# Altium PCB LEDControl1.PcbDoc (part 1 of 6)
Units mm, origin at the board's own origin, x right, y up, seen from the top; angles counter-clockwise.
Board outline 380 x 185 mm, 2 copper layers (Top Layer, Bottom Layer), stack 0.533 mm thick; 673 components, 368 nets, 1993 pads, 2553 vias.
Unrouted connection lines stored in the file: 1155.
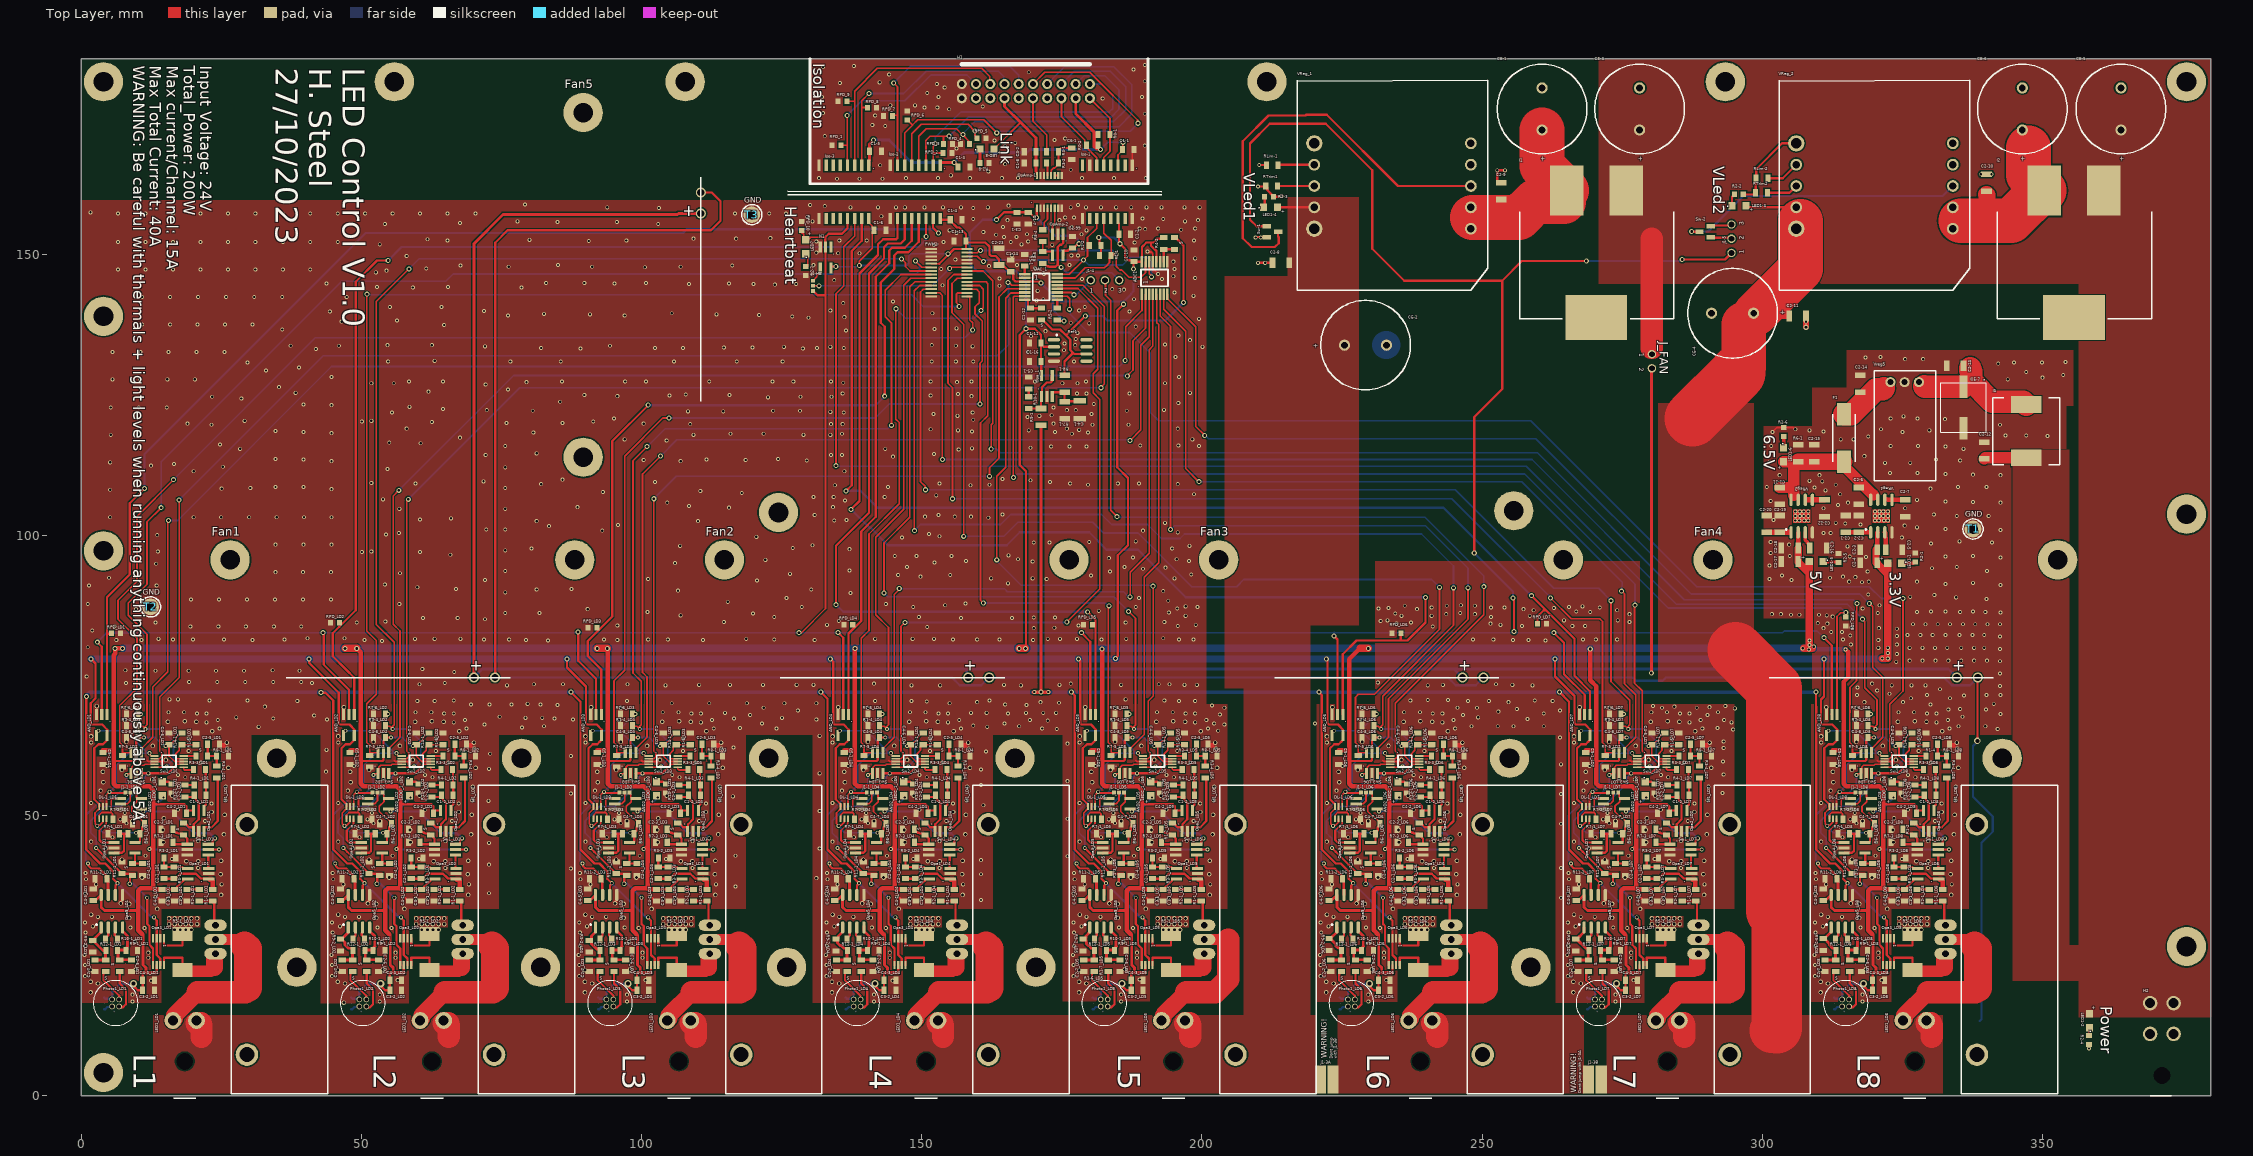
[diagram p0: Top Layer view]
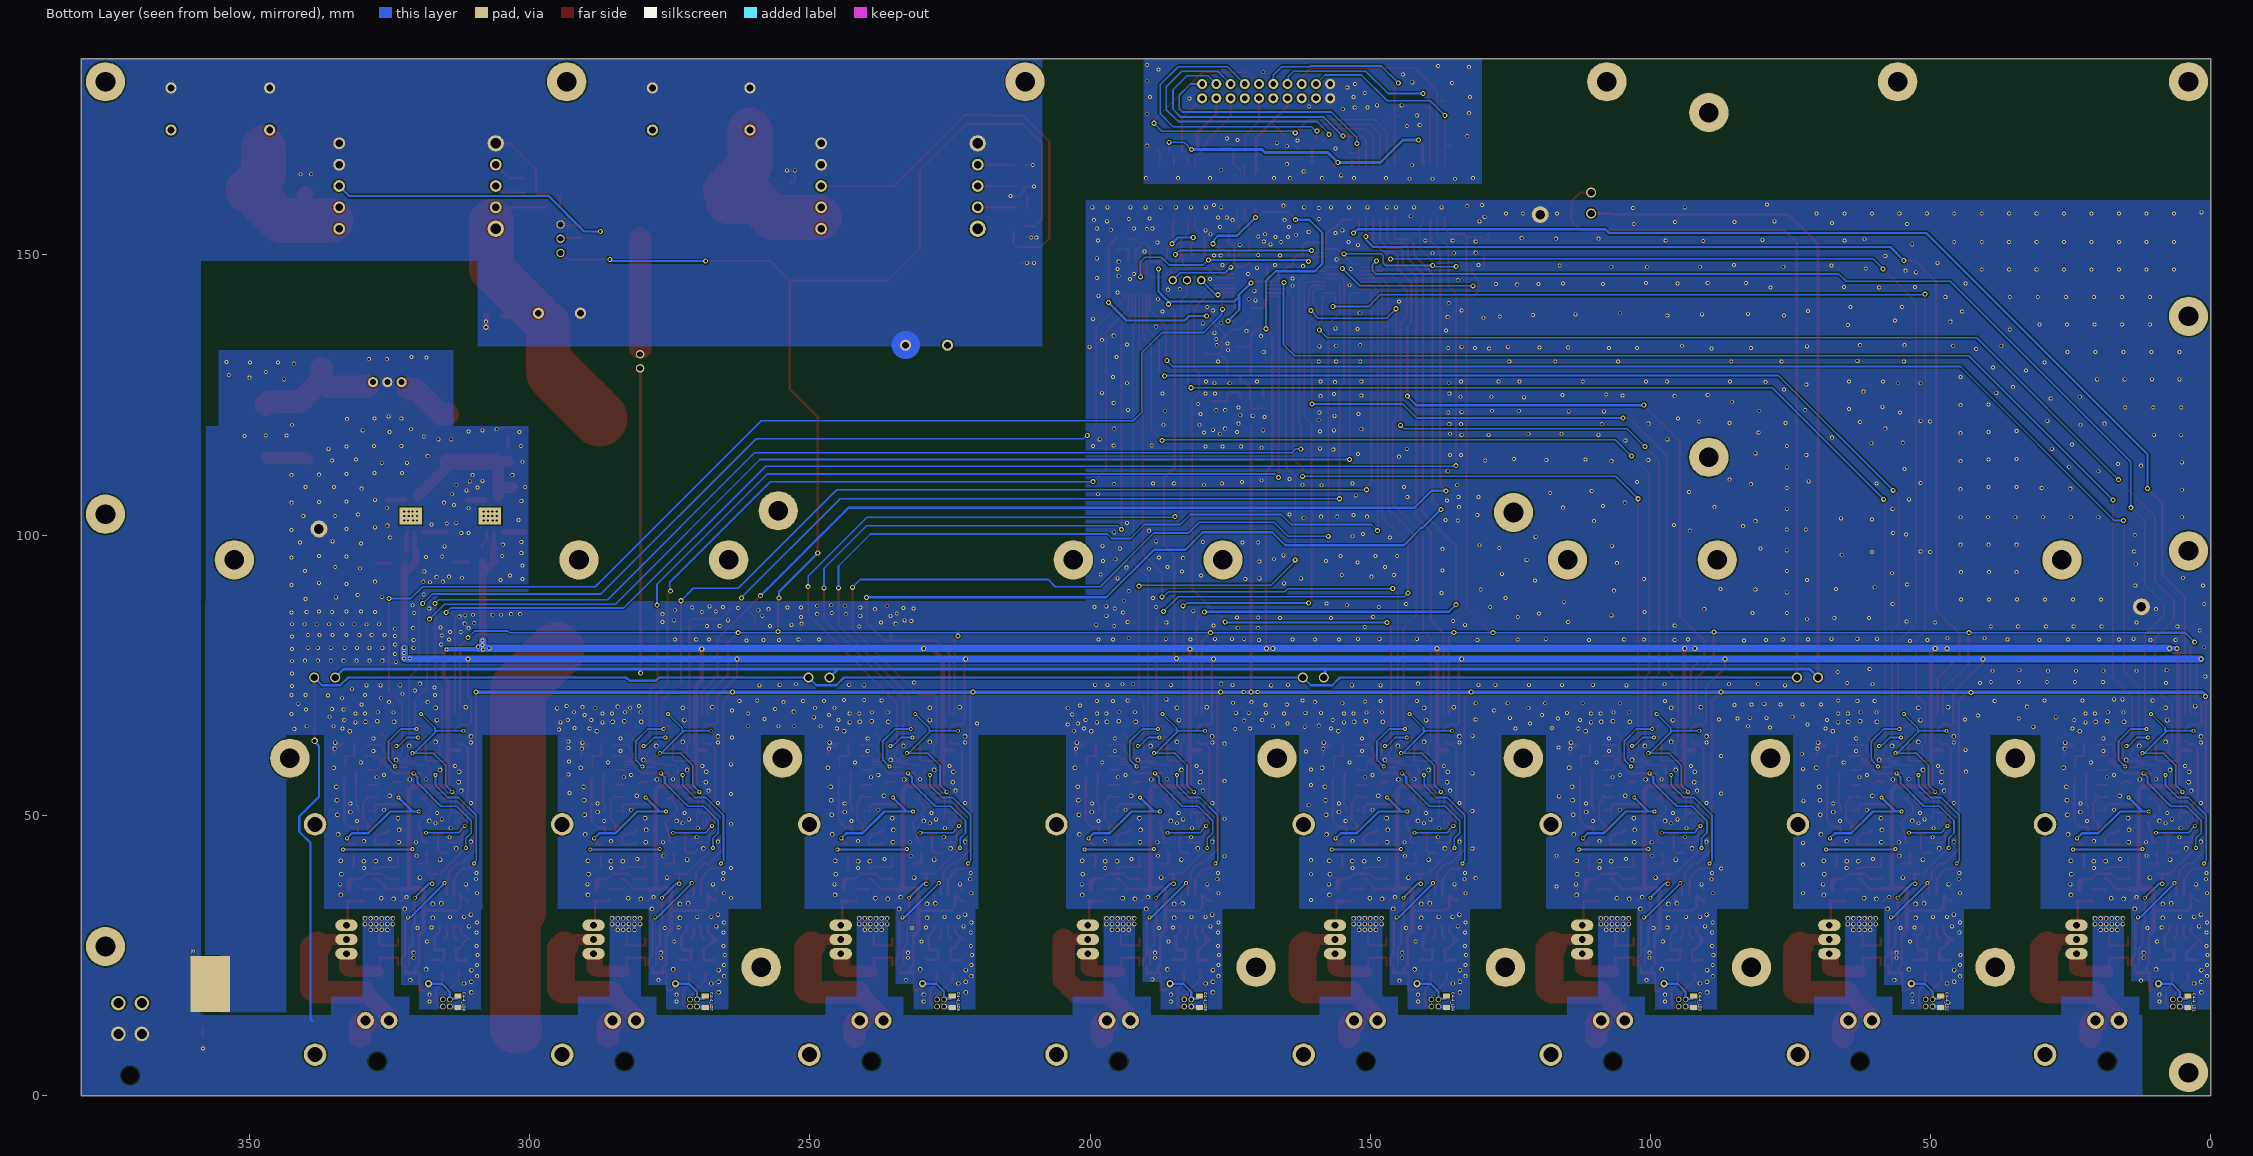
[diagram p1: Bottom Layer view, seen from below]

## Layer stack, top to bottom
Top Solder: solder mask 0.0102, Solder Resist, Dk 3.5
Top Layer: signal copper 0.0356
Dielectric 2: prepreg 0.0711, PP-006, Dk 4.1
Dielectric 1: dielectric 0.32, FR-4, Dk 4.8
Dielectric 3: prepreg 0.0711, PP-006, Dk 4.1
Bottom Layer: signal copper 0.0356
Bottom Solder: solder mask 0.0102, Solder Resist, Dk 3.5

## Board outline
0,0 0,185 380,185 380,0

## Design rules (kind name [scope] priority, off if disabled: settings)
Clearance [All] p1: gap=0.25 ignorepadtopadclearanceinfootprint=TRUE except(0: Arc-Text Track-Text SMDPad-Text THPad-Text Via-Text Fill-Text Poly-Text Region-Text Text-Text Text-Hole; 0.2: Arc-Arc Arc-Track Arc-SMDPad Track-Track Track-SMDPad SMDPad-SMDPad THPad-THPad)
HoleSize [All] p1: absolutevalues=TRUE maxlimit=99 minlimit=0.025 maxpercent=80.000 minpercent=20.000
MinimumSolderMaskSliver [All] p1: minsoldermaskwidth=0
PlaneConnect [All] p1: planeconnectstyle=Direct reliefexpansion=0.508 reliefentries=4 reliefconductorwidth=0.254 reliefairgap=0.254
PolygonConnect [All] p1: connectstyle=Direct reliefconductorwidth=0.5 reliefentries=4 polygonreliefangle="90 Angle" airgapwidth=0.254
RoomDefinition SyncBoard1 [InComponentClass('SyncBoard1')] p1: confinementstyle=ConfineIn formatcopy=TRUE lockcomponents=FALSE outline 264.6,0 308.7,0 308.7,69.8 264.6,69.8
RoutingVias [All] p1: holewidth=0.45 width=0.8 viastyle="Through Hole" minholewidth=0.3 minwidth=0.5 maxholewidth=2 maxwidth=10
SolderMaskExpansion [All] p1: expansion=0.102 istentingtop=FALSE
Width [All] p1: maxlimit=50 minlimit=0.254 preferedwidth=0.254 minimp=50.000000 maximp=50.000000 favimp=50.000000
27 further rules are at their usual default settings.

## Classes and differential pairs
channel class LEDDrive1: LD1 LD2 LD3 LD4 LD5 LD6 LD7 LD8
net class VLed[1..8]: VLed1 VLed6 VLed7
net class EN[1..8]: EN1 EN2 EN3 EN4 EN5 EN6 EN7 EN8
net class DB[1..8]: DB1 DB2 DB3 DB4 DB5 DB6 DB7 DB8
net class DAC[1..8]: DAC1 DAC2 DAC3 DAC4 DAC5 DAC6 DAC7 DAC8
net class DA[1..8]: DA1 DA2 DA3 DA4 DA5 DA6 DA7 DA8
net class ADC[1..8]: ADC1 ADC2 ADC3 ADC4 ADC5 ADC6 ADC7 ADC8
component class LEDControl1: ADC1 C1-1 C1-2 C1-3 C1-4 C1-5 C1-6 C1-7 C1-8 C1-10 C1-11 C1-12 C1-13 C1-14 C1-16 C1-99 C2-1 C2-2 C2-3 C2-4 C2-5 C2-6 C2-7 C2-8 C2-9 C2-10 C2-11 C2-12 C2-13 C2-14 C2-15 C2-16 C2-17 C2-18 C2-19 C2-20 C2-21 C2-22 C2-23 C3-1 C3-2 C4-1 C5-1 C6-1 CE-1 CE-2 CE-3 CE-4 CE-5 CE-6 CE-7 DAC_1 F1 Fan1 Fan2 Fan3 Fan4 Fan5 H1 H2 I1 I2 I3 Iso-1 Iso-2 Iso-3 J1-3A J1-3B J1-4 J1-5 J1-HB J_FAN JG LED1-1 LED1-2 LED1-3 LED1-4 LED1-5 LED1-6 LED7 LED-8 N1 Opa_1 OpAmp-1 OpAmp-2 PWM1 R0-1 R0-2 R1-1 R1-2 R1-3_LD8 R2-1 R2-2 R2-3 R2-4 R2-5 R2-6 R2-7 R2-8 R3-1 R3-2 R3-3 R3-4_LD5 R4-2 R5-1 R5-2 R6-1 R7-1 R8-1 R9-1 R10-1 Ref1 RLim-1 RLim-2 RPD_1 RPD_2 RPD_3 RPD_4 RPD_5 RPD_6 RPD_7 RPD_8 RPD_9 RPD_10 RTrim1 RTrim2 Sw-1 Sw-2 T1 T2 T3 VReg3 VReg4 Vreg5 VReg_1 VReg_2
component class LD8: AND2_LD8 AND_LD8 C1-1_LD8 C1-2_LD8 C2-1_LD8 C2-2_LD8 C2-3_LD8 C2-4_LD8 C2-5_LD8 C2-6_LD8 C2-7_LD8 C3-1_LD8 C3-2_LD8 C4-1_LD8 C4-2_LD8 C4-3_LD8 C4-4_LD8 C4-5_LD8 C4-6_LD8 C4-7_LD8 C4-8_LD8 C5-1_LD8 DL-1_LD8 J1-1_LD8 LED1_LD8 LEDC_1_LD8 M1_LD8 Opa1_LD8 Opa2_LD8 Opa3_LD8 Opa4_LD8 Opa5_LD8 Photo1_LD8 R1-1_LD8 R1-3_LD8 R1-5_LD8 R2-1_LD8 R3-1_LD8 R3-2_LD8 R3-3_LD8 R3-4_LD8 R4-1_LD8 R5-1_LD8 R6-1_LD8 R7-1_LD8 R7-2_LD8 R7-3_LD8 R7-4_LD8 R7-5_LD8 R7-6_LD8 R8-1_LD8 R9-1_LD8 R9-2_LD8 R10-1_LD8 R11-1_LD8 R11-2_LD8 R12-1_LD8 R13-1_LD8 R14-1_LD8 RPD_LD8 Sw1_LD8 Sw2_LD8 Sw3_LD8
component class LD7: AND2_LD7 AND_LD7 C1-1_LD7 C1-2_LD7 C2-1_LD7 C2-2_LD7 C2-3_LD7 C2-4_LD7 C2-5_LD7 C2-6_LD7 C2-7_LD7 C3-1_LD7 C3-2_LD7 C4-1_LD7 C4-2_LD7 C4-3_LD7 C4-4_LD7 C4-5_LD7 C4-6_LD7 C4-7_LD7 C4-8_LD7 C5-1_LD7 DL-1_LD7 J1-1_LD7 LED1_LD7 LEDC_1_LD7 M1_LD7 Opa1_LD7 Opa2_LD7 Opa3_LD7 Opa4_LD7 Opa5_LD7 Photo1_LD7 R1-1_LD7 R1-3_LD8 R1-5_LD7 R2-1_LD7 R3-1_LD7 R3-2_LD7 R3-3_LD7 R3-4_LD7 R4-1_LD7 R5-1_LD7 R6-1_LD7 R7-1_LD7 R7-2_LD7 R7-3_LD7 R7-4_LD7 R7-5_LD7 R7-6_LD7 R8-1_LD7 R9-1_LD7 R9-2_LD7 R10-1_LD7 R11-1_LD7 R11-2_LD7 R12-1_LD7 R13-1_LD7 R14-1_LD7 RPD_LD7 Sw1_LD7 Sw2_LD7 Sw3_LD7
component class LD6: AND2_LD6 AND_LD6 C1-1_LD6 C1-2_LD6 C2-1_LD6 C2-2_LD6 C2-3_LD6 C2-4_LD6 C2-5_LD6 C2-6_LD6 C2-7_LD6 C3-1_LD6 C3-2_LD6 C4-1_LD6 C4-2_LD6 C4-3_LD6 C4-4_LD6 C4-5_LD6 C4-6_LD6 C4-7_LD6 C4-8_LD6 C5-1_LD6 DL-1_LD6 J1-1_LD6 LED1_LD6 LEDC_1_LD6 M1_LD6 Opa1_LD6 Opa2_LD6 Opa3_LD6 Opa4_LD6 Opa5_LD6 Photo1_LD6 R1-1_LD6 R1-3_LD8 R1-5_LD6 R2-1_LD6 R3-1_LD6 R3-2_LD6 R3-3_LD6 R3-4_LD6 R4-1_LD6 R5-1_LD6 R6-1_LD6 R7-1_LD6 R7-2_LD6 R7-3_LD6 R7-4_LD6 R7-5_LD6 R7-6_LD6 R8-1_LD6 R9-1_LD6 R9-2_LD6 R10-1_LD6 R11-1_LD6 R11-2_LD6 R12-1_LD6 R13-1_LD6 R14-1_LD6 RPD_LD6 Sw1_LD6 Sw2_LD6 Sw3_LD6
component class LD5: AND2_LD5 AND_LD5 C1-1_LD5 C1-2_LD5 C2-1_LD5 C2-2_LD5 C2-3_LD5 C2-4_LD5 C2-5_LD5 C2-6_LD5 C2-7_LD5 C3-1_LD5 C3-2_LD5 C4-1_LD5 C4-2_LD5 C4-3_LD5 C4-4_LD5 C4-5_LD5 C4-6_LD5 C4-7_LD5 C4-8_LD5 C5-1_LD5 DL-1_LD5 J1-1_LD5 LED1_LD5 LEDC_1_LD5 M1_LD5 Opa1_LD5 Opa2_LD5 Opa3_LD5 Opa4_LD5 Opa5_LD5 Photo1_LD5 R1-1_LD5 R1-3_LD8 R1-5_LD5 R2-1_LD5 R3-1_LD5 R3-2_LD5 R3-3_LD5 R3-4_LD5 R4-1_LD5 R5-1_LD5 R6-1_LD5 R7-1_LD5 R7-2_LD5 R7-3_LD5 R7-4_LD5 R7-5_LD5 R7-6_LD5 R8-1_LD5 R9-1_LD5 R9-2_LD5 R10-1_LD5 R11-1_LD5 R11-2_LD5 R12-1_LD5 R13-1_LD5 R14-1_LD5 RPD_LD5 Sw1_LD5 Sw2_LD5 Sw3_LD5
component class LD4: AND2_LD4 AND_LD4 C1-1_LD4 C1-2_LD4 C2-1_LD4 C2-2_LD4 C2-3_LD4 C2-4_LD4 C2-5_LD4 C2-6_LD4 C2-7_LD4 C3-1_LD4 C3-2_LD4 C4-1_LD4 C4-2_LD4 C4-3_LD4 C4-4_LD4 C4-5_LD4 C4-6_LD4 C4-7_LD4 C4-8_LD4 C5-1_LD4 DL-1_LD4 J1-1_LD4 LED1_LD4 LEDC_1_LD4 M1_LD4 Opa1_LD4 Opa2_LD4 Opa3_LD4 Opa4_LD4 Opa5_LD4 Photo1_LD4 R1-1_LD4 R1-3_LD8 R1-5_LD4 R2-1_LD4 R3-1_LD4 R3-2_LD4 R3-3_LD4 R3-4_LD4 R4-1_LD4 R5-1_LD4 R6-1_LD4 R7-1_LD4 R7-2_LD4 R7-3_LD4 R7-4_LD4 R7-5_LD4 R7-6_LD4 R8-1_LD4 R9-1_LD4 R9-2_LD4 R10-1_LD4 R11-1_LD4 R11-2_LD4 R12-1_LD4 R13-1_LD4 R14-1_LD4 RPD_LD4 Sw1_LD4 Sw2_LD4 Sw3_LD4
component class LD3: AND2_LD3 AND_LD3 C1-1_LD3 C1-2_LD3 C2-1_LD3 C2-2_LD3 C2-3_LD3 C2-4_LD3 C2-5_LD3 C2-6_LD3 C2-7_LD3 C3-1_LD3 C3-2_LD3 C4-1_LD3 C4-2_LD3 C4-3_LD3 C4-4_LD3 C4-5_LD3 C4-6_LD3 C4-7_LD3 C4-8_LD3 C5-1_LD3 DL-1_LD3 J1-1_LD3 LED1_LD3 LEDC_1_LD3 M1_LD3 Opa1_LD3 Opa2_LD3 Opa3_LD3 Opa4_LD3 Opa5_LD3 Photo1_LD3 R1-1_LD3 R1-3_LD8 R1-5_LD3 R2-1_LD3 R3-1_LD3 R3-2_LD3 R3-3_LD3 R3-4_LD3 R4-1_LD3 R5-1_LD3 R6-1_LD3 R7-1_LD3 R7-2_LD3 R7-3_LD3 R7-4_LD3 R7-5_LD3 R7-6_LD3 R8-1_LD3 R9-1_LD3 R9-2_LD3 R10-1_LD3 R11-1_LD3 R11-2_LD3 R12-1_LD3 R13-1_LD3 R14-1_LD3 RPD_LD3 Sw1_LD3 Sw2_LD3 Sw3_LD3
component class LD2: AND2_LD2 AND_LD2 C1-1_LD2 C1-2_LD2 C2-1_LD2 C2-2_LD2 C2-3_LD2 C2-4_LD2 C2-5_LD2 C2-6_LD2 C2-7_LD2 C3-1_LD2 C3-2_LD2 C4-1_LD2 C4-2_LD2 C4-3_LD2 C4-4_LD2 C4-5_LD2 C4-6_LD2 C4-7_LD2 C4-8_LD2 C5-1_LD2 DL-1_LD2 J1-1_LD2 LED1_LD2 LEDC_1_LD2 M1_LD2 Opa1_LD2 Opa2_LD2 Opa3_LD2 Opa4_LD2 Opa5_LD2 Photo1_LD2 R1-1_LD2 R1-3_LD8 R1-5_LD2 R2-1_LD2 R3-1_LD2 R3-2_LD2 R3-3_LD2 R3-4_LD2 R4-1_LD2 R5-1_LD2 R6-1_LD2 R7-1_LD2 R7-2_LD2 R7-3_LD2 R7-4_LD2 R7-5_LD2 R7-6_LD2 R8-1_LD2 R9-1_LD2 R9-2_LD2 R10-1_LD2 R11-1_LD2 R11-2_LD2 R12-1_LD2 R13-1_LD2 R14-1_LD2 RPD_LD2 Sw1_LD2 Sw2_LD2 Sw3_LD2
component class LD1: AND2_LD1 AND_LD1 C1-1_LD1 C1-2_LD1 C2-1_LD1 C2-2_LD1 C2-3_LD1 C2-4_LD1 C2-5_LD1 C2-6_LD1 C2-7_LD1 C3-1_LD1 C3-2_LD1 C4-1_LD1 C4-2_LD1 C4-3_LD1 C4-4_LD1 C4-5_LD1 C4-6_LD1 C4-7_LD1 C4-8_LD1 C5-1_LD1 DL-1_LD1 J1-1_LD1 LED1_LD1 LEDC_1_LD1 M1_LD1 Opa1_LD1 Opa2_LD1 Opa3_LD1 Opa4_LD1 Opa5_LD1 Photo1_LD1 R1-1_LD1 R1-3_LD8 R1-5_LD1 R2-1_LD1 R3-1_LD1 R3-2_LD1 R3-3_LD1 R3-4_LD1 R4-1_LD1 R5-1_LD1 R6-1_LD1 R7-1_LD1 R7-2_LD1 R7-3_LD1 R7-4_LD1 R7-5_LD1 R7-6_LD1 R8-1_LD1 R9-1_LD1 R9-2_LD1 R10-1_LD1 R11-1_LD1 R11-2_LD1 R12-1_LD1 R13-1_LD1 R14-1_LD1 RPD_LD1 Sw1_LD1 Sw2_LD1 Sw3_LD1

## Components (designator, comment, footprint, x,y, rotation, side; value= is the part's Value field where it differs from the comment)
ADC1 "ADS7828" 16-TSSOP 189.3,143 r90 top
AND2_LD1 "AND_Gate" SOT23-5 7.05,53 r0 top (schematic designator AND2)
AND2_LD2 "AND_Gate" SOT23-5 51.15,53 r0 top (schematic designator AND2)
AND2_LD3 "AND_Gate" SOT23-5 95.25,53 r0 top (schematic designator AND2)
AND2_LD4 "AND_Gate" SOT23-5 139.35,53 r0 top (schematic designator AND2)
AND2_LD5 "AND_Gate" SOT23-5 183.45,53 r0 top (schematic designator AND2)
AND2_LD6 "AND_Gate" SOT23-5 227.55,53 r0 top (schematic designator AND2)
AND2_LD7 "AND_Gate" SOT23-5 271.65,53 r0 top (schematic designator AND2)
AND2_LD8 "AND_Gate" SOT23-5 315.75,53 r0 top (schematic designator AND2)
AND_LD1 "AND_Gate" SOT23-5 4.65,68 r270 top (schematic designator AND)
AND_LD2 "AND_Gate" SOT23-5 48.75,68 r270 top (schematic designator AND)
AND_LD3 "AND_Gate" SOT23-5 92.85,68 r270 top (schematic designator AND)
AND_LD4 "AND_Gate" SOT23-5 136.95,68 r270 top (schematic designator AND)
AND_LD5 "AND_Gate" SOT23-5 181.05,68 r270 top (schematic designator AND)
AND_LD6 "AND_Gate" SOT23-5 225.15,68 r270 top (schematic designator AND)
AND_LD7 "AND_Gate" SOT23-5 269.25,68 r270 top (schematic designator AND)
AND_LD8 "AND_Gate" SOT23-5 313.35,68 r270 top (schematic designator AND)
C1-1 "0.1uF" 0805 187.9,168.8 r180 top
C1-1_LD1 "500pF NP0" 0805 18.9,36.8 r270 top (schematic designator C1-1)
C1-1_LD2 "500pF NP0" 0805 63,36.8 r270 top (schematic designator C1-1)
C1-1_LD3 "500pF NP0" 0805 107.1,36.8 r270 top (schematic designator C1-1)
C1-1_LD4 "500pF NP0" 0805 151.2,36.8 r270 top (schematic designator C1-1)
C1-1_LD5 "500pF NP0" 0805 195.3,36.8 r270 top (schematic designator C1-1)
C1-1_LD6 "500pF NP0" 0805 239.4,36.8 r270 top (schematic designator C1-1)
C1-1_LD7 "500pF NP0" 0805 283.5,36.8 r270 top (schematic designator C1-1)
C1-1_LD8 "500pF NP0" 0805 327.6,36.8 r270 top (schematic designator C1-1)
C1-2 "0.1uF" 0805 187.3,153.7 r180 top
C1-2_LD1 "200pF NP0" 0805 22.3,53.6 r180 top (schematic designator C1-2)
C1-2_LD2 "200pF NP0" 0805 66.4,53.6 r180 top (schematic designator C1-2)
C1-2_LD3 "200pF NP0" 0805 110.5,53.6 r180 top (schematic designator C1-2)
C1-2_LD4 "200pF NP0" 0805 154.6,53.6 r180 top (schematic designator C1-2)
C1-2_LD5 "200pF NP0" 0805 198.7,53.6 r180 top (schematic designator C1-2)
C1-2_LD6 "200pF NP0" 0805 242.8,53.6 r180 top (schematic designator C1-2)
C1-2_LD7 "200pF NP0" 0805 286.9,53.6 r180 top (schematic designator C1-2)
C1-2_LD8 "200pF NP0" 0805 331,53.6 r180 top (schematic designator C1-2)
C1-3 "0.1uF" 0805 156.5,165.7 r0 top
C1-4 "0.1uF" 0805 155.1,156.3 r0 top
C1-5 "0.1uF" 0805 140.7,168.5 r0 top
C1-6 "0.1uF" 0805 141.5,154.4 r0 top
C1-7 "0.1uF" 0805 169,155.5 r90 top
C1-8 "0.1uF" 0805 170.4,166.4 r180 top
C1-10 "0.1uF" 0805 187.9,148.8 r90 top
C1-11 "0.1uF" 0805 171.3,134.3 r180 top
C1-12 "0.1uF" 0805 169.4,138.4 r90 top
C1-13 "0.1uF" 0805 157.9,152.5 r180 top
C1-14 "0.1uF" 0805 165.9,149.1 r270 top
C1-16 "0.1uF" 0805 171.3,131 r180 top
C1-99 "0.1uF" 0805 176.9,151.2 r90 top
C2-1 "22uF X7R" 1206 314.9,100.5 r90 top
C2-1_LD1 "20,39pF NP0" 0805 14.8,40.8 r270 top (schematic designator C2-1)
C2-1_LD2 "20,39pF NP0" 0805 58.9,40.8 r270 top (schematic designator C2-1)
C2-1_LD3 "20,39pF NP0" 0805 103,40.8 r270 top (schematic designator C2-1)
C2-1_LD4 "20,39pF NP0" 0805 147.1,40.8 r270 top (schematic designator C2-1)
C2-1_LD5 "20,39pF NP0" 0805 191.2,40.8 r270 top (schematic designator C2-1)
C2-1_LD6 "20,39pF NP0" 0805 235.3,40.8 r270 top (schematic designator C2-1)
C2-1_LD7 "20,39pF NP0" 0805 279.4,40.8 r270 top (schematic designator C2-1)
C2-1_LD8 "20,39pF NP0" 0805 323.5,40.8 r270 top (schematic designator C2-1)
C2-2 "22uF X7R" 1206 317.2,100.5 r90 top
C2-2_LD1 "20pF NP0" 0805 18.5,55.4 r270 top (schematic designator C2-2)
C2-2_LD2 "20pF NP0" 0805 62.6,55.4 r270 top (schematic designator C2-2)
C2-2_LD3 "20pF NP0" 0805 106.7,55.4 r270 top (schematic designator C2-2)
C2-2_LD4 "20pF NP0" 0805 150.8,55.4 r270 top (schematic designator C2-2)
C2-2_LD5 "20pF NP0" 0805 194.9,55.4 r270 top (schematic designator C2-2)
C2-2_LD6 "20pF NP0" 0805 239,55.4 r270 top (schematic designator C2-2)
C2-2_LD7 "20pF NP0" 0805 283.1,55.4 r270 top (schematic designator C2-2)
C2-2_LD8 "20pF NP0" 0805 327.2,55.4 r270 top (schematic designator C2-2)
C2-3 "22uF X7R" 1206 317.5,97.4 r0 top
C2-3_LD1 "NC" 0805 16.4,47.5 r180 top (schematic designator C2-3)
C2-3_LD2 "NC" 0805 60.5,47.5 r180 top (schematic designator C2-3)
C2-3_LD3 "NC" 0805 104.6,47.5 r180 top (schematic designator C2-3)
C2-3_LD4 "NC" 0805 148.7,47.5 r180 top (schematic designator C2-3)
C2-3_LD5 "NC" 0805 192.8,47.5 r180 top (schematic designator C2-3)
C2-3_LD6 "NC" 0805 236.9,47.5 r180 top (schematic designator C2-3)
C2-3_LD7 "NC" 0805 281,47.5 r180 top (schematic designator C2-3)
C2-3_LD8 "NC" 0805 325.1,47.5 r180 top (schematic designator C2-3)
C2-4 "22uF X7R" 1206 317.5,95.1 r0 top
C2-4_LD1 "NC" 0805 11,41.4 r270 top (schematic designator C2-4)
C2-4_LD2 "NC" 0805 55.1,41.4 r270 top (schematic designator C2-4)
C2-4_LD3 "NC" 0805 99.2,41.4 r270 top (schematic designator C2-4)
C2-4_LD4 "NC" 0805 143.3,41.4 r270 top (schematic designator C2-4)
C2-4_LD5 "NC" 0805 187.4,41.4 r270 top (schematic designator C2-4)
C2-4_LD6 "NC" 0805 231.5,41.4 r270 top (schematic designator C2-4)
C2-4_LD7 "NC" 0805 275.6,41.4 r270 top (schematic designator C2-4)
C2-4_LD8 "NC" 0805 319.7,41.4 r270 top (schematic designator C2-4)
C2-5 "22uF X7R" 1206 325,97.4 r180 top
C2-5_LD1 "NC" 0805 24.7,62.7 r180 top (schematic designator C2-5)
C2-5_LD2 "NC" 0805 68.8,62.7 r180 top (schematic designator C2-5)
C2-5_LD3 "NC" 0805 112.9,62.7 r180 top (schematic designator C2-5)
C2-5_LD4 "NC" 0805 157,62.7 r180 top (schematic designator C2-5)
C2-5_LD5 "NC" 0805 201.1,62.7 r180 top (schematic designator C2-5)
C2-5_LD6 "NC" 0805 245.2,62.7 r180 top (schematic designator C2-5)
C2-5_LD7 "NC" 0805 289.3,62.7 r180 top (schematic designator C2-5)
C2-5_LD8 "NC" 0805 333.4,62.7 r180 top (schematic designator C2-5)
C2-6 "22uF X7R" 1206 317.2,108.5 r270 top
C2-6_LD1 "NC" 0805 9,22.1 r90 top (schematic designator C2-6)
C2-6_LD2 "NC" 0805 53.1,22.1 r90 top (schematic designator C2-6)
C2-6_LD3 "NC" 0805 97.2,22.1 r90 top (schematic designator C2-6)
C2-6_LD4 "NC" 0805 141.3,22.1 r90 top (schematic designator C2-6)
C2-6_LD5 "NC" 0805 185.4,22.1 r90 top (schematic designator C2-6)
C2-6_LD6 "NC" 0805 229.5,22.1 r90 top (schematic designator C2-6)
C2-6_LD7 "NC" 0805 273.6,22.1 r90 top (schematic designator C2-6)
C2-6_LD8 "NC" 0805 317.7,22.1 r90 top (schematic designator C2-6)
C2-7 "10uF X7R" 1206 325.5,103.3 r90 top
C2-7_LD1 "NC" 0805 2.5,22.1 r90 top (schematic designator C2-7)
C2-7_LD2 "NC" 0805 46.6,22.1 r90 top (schematic designator C2-7)
C2-7_LD3 "NC" 0805 90.7,22.1 r90 top (schematic designator C2-7)
C2-7_LD4 "NC" 0805 134.8,22.1 r90 top (schematic designator C2-7)
C2-7_LD5 "NC" 0805 178.9,22.1 r90 top (schematic designator C2-7)
C2-7_LD6 "NC" 0805 223,22.1 r90 top (schematic designator C2-7)
C2-7_LD7 "NC" 0805 267.1,22.1 r90 top (schematic designator C2-7)
C2-7_LD8 "NC" 0805 311.2,22.1 r90 top (schematic designator C2-7)
C2-8 "22uF X7R" 1206 215.6,148.6 r180 top
C2-9 "22uF X7R" 1206 253.4,159.9 r90 top
C2-10 "22uF X7R" 1206 340,161.4 r90 top
C2-11 "22uF X7R" 1206 304.8,139.1 r0 top
C2-12 "10uF X7R" 1206 339.6,113.6 r90 top
C2-13 "10uF X7R" 1206 335.9,130.2 r180 top
C2-14 "10uF X7R" 1206 317.5,125.5 r90 top
C2-15 "10uF X7R" 1206 309.3,113.1 r90 top
C2-16 "22uF X7R" 1206 311.5,97.7 r180 top
C2-17 "22uF X7R" 1206 303.4,95.3 r0 top
C2-18 "22uF X7R" 1206 303.4,97.7 r0 top
C2-19 "22uF X7R" 1206 303.1,100.5 r90 top
C2-20 "22uF X7R" 1206 300.8,100.5 r90 top
C2-21 "22uF X7R" 1206 303.1,108.5 r270 top
C2-22 "10uF X7R" 1206 311.1,103.3 r90 top
C2-23 "10uF X7R" 1206 163.8,151.2 r270 top
C3-1 "10uF" 0805 167,155.5 r90 top
C3-1_LD1 "10uF" 0805 16.7,36.8 r270 top (schematic designator C3-1)
C3-1_LD2 "10uF" 0805 60.8,36.8 r270 top (schematic designator C3-1)
C3-1_LD3 "10uF" 0805 104.9,36.8 r270 top (schematic designator C3-1)
C3-1_LD4 "10uF" 0805 149,36.8 r270 top (schematic designator C3-1)
C3-1_LD5 "10uF" 0805 193.1,36.8 r270 top (schematic designator C3-1)
C3-1_LD6 "10uF" 0805 237.2,36.8 r270 top (schematic designator C3-1)
C3-1_LD7 "10uF" 0805 281.3,36.8 r270 top (schematic designator C3-1)
C3-1_LD8 "10uF" 0805 325.4,36.8 r270 top (schematic designator C3-1)
C3-2 "10uF" 0805 170.4,168.4 r180 top
C3-2_LD1 "10uF" 0805 13.1,18.8 r180 top (schematic designator C3-2)
C3-2_LD2 "10uF" 0805 57.2,18.8 r180 top (schematic designator C3-2)
C3-2_LD3 "10uF" 0805 101.3,18.8 r180 top (schematic designator C3-2)
C3-2_LD4 "10uF" 0805 145.4,18.8 r180 top (schematic designator C3-2)
C3-2_LD5 "10uF" 0805 189.5,18.8 r180 top (schematic designator C3-2)
C3-2_LD6 "10uF" 0805 233.6,18.8 r180 top (schematic designator C3-2)
C3-2_LD7 "10uF" 0805 277.7,18.8 r180 top (schematic designator C3-2)
C3-2_LD8 "10uF" 0805 321.8,18.8 r180 top (schematic designator C3-2)
C4-1 "0.1uF NP0" 1206_Wide 178.2,124 r270 top
C4-1_LD1 "0.1uF" 0805 14.5,36.8 r270 top (schematic designator C4-1)
C4-1_LD2 "0.1uF" 0805 58.6,36.8 r270 top (schematic designator C4-1)
C4-1_LD3 "0.1uF" 0805 102.7,36.8 r270 top (schematic designator C4-1)
C4-1_LD4 "0.1uF" 0805 146.8,36.8 r270 top (schematic designator C4-1)
C4-1_LD5 "0.1uF" 0805 190.9,36.8 r270 top (schematic designator C4-1)
C4-1_LD6 "0.1uF" 0805 235,36.8 r270 top (schematic designator C4-1)
C4-1_LD7 "0.1uF" 0805 279.1,36.8 r270 top (schematic designator C4-1)
C4-1_LD8 "0.1uF" 0805 323.2,36.8 r270 top (schematic designator C4-1)
C4-2_LD1 "0.1uF" 0805 18.8,50.4 r180 top (schematic designator C4-2)
C4-2_LD2 "0.1uF" 0805 62.9,50.4 r180 top (schematic designator C4-2)
C4-2_LD3 "0.1uF" 0805 107,50.4 r180 top (schematic designator C4-2)
C4-2_LD4 "0.1uF" 0805 151.1,50.4 r180 top (schematic designator C4-2)
C4-2_LD5 "0.1uF" 0805 195.2,50.4 r180 top (schematic designator C4-2)
C4-2_LD6 "0.1uF" 0805 239.3,50.4 r180 top (schematic designator C4-2)
C4-2_LD7 "0.1uF" 0805 283.4,50.4 r180 top (schematic designator C4-2)
C4-2_LD8 "0.1uF" 0805 327.5,50.4 r180 top (schematic designator C4-2)
C4-3_LD1 "0.1uF" 0805 13.1,20.6 r180 top (schematic designator C4-3)
C4-3_LD2 "0.1uF" 0805 57.2,20.6 r180 top (schematic designator C4-3)
C4-3_LD3 "0.1uF" 0805 101.3,20.6 r180 top (schematic designator C4-3)
C4-3_LD4 "0.1uF" 0805 145.4,20.6 r180 top (schematic designator C4-3)
C4-3_LD5 "0.1uF" 0805 189.5,20.6 r180 top (schematic designator C4-3)
C4-3_LD6 "0.1uF" 0805 233.6,20.6 r180 top (schematic designator C4-3)
C4-3_LD7 "0.1uF" 0805 277.7,20.6 r180 top (schematic designator C4-3)
C4-3_LD8 "0.1uF" 0805 321.8,20.6 r180 top (schematic designator C4-3)
C4-4_LD1 "0.1uF" 0805 4.1,15.7 r90 bottom (schematic designator C4-4)
C4-4_LD2 "0.1uF" 0805 48.2,15.7 r90 bottom (schematic designator C4-4)
C4-4_LD3 "0.1uF" 0805 92.3,15.7 r90 bottom (schematic designator C4-4)
C4-4_LD4 "0.1uF" 0805 136.4,15.7 r90 bottom (schematic designator C4-4)
C4-4_LD5 "0.1uF" 0805 180.5,15.7 r90 bottom (schematic designator C4-4)
C4-4_LD6 "0.1uF" 0805 224.6,15.7 r90 bottom (schematic designator C4-4)
C4-4_LD7 "0.1uF" 0805 268.7,15.7 r90 bottom (schematic designator C4-4)
C4-4_LD8 "0.1uF" 0805 312.8,15.7 r90 bottom (schematic designator C4-4)
C4-5_LD1 "0.1uF" 0805 2.2,36.9 r270 top (schematic designator C4-5)
C4-5_LD2 "0.1uF" 0805 46.3,36.9 r270 top (schematic designator C4-5)
C4-5_LD3 "0.1uF" 0805 90.4,36.9 r270 top (schematic designator C4-5)
C4-5_LD4 "0.1uF" 0805 134.5,36.9 r270 top (schematic designator C4-5)
C4-5_LD5 "0.1uF" 0805 178.6,36.9 r270 top (schematic designator C4-5)
C4-5_LD6 "0.1uF" 0805 222.7,36.9 r270 top (schematic designator C4-5)
C4-5_LD7 "0.1uF" 0805 266.8,36.9 r270 top (schematic designator C4-5)
C4-5_LD8 "0.1uF" 0805 310.9,36.9 r270 top (schematic designator C4-5)
C4-6_LD1 "0.1uF" 0805 15.7,64.7 r270 top (schematic designator C4-6)
C4-6_LD2 "0.1uF" 0805 59.8,64.7 r270 top (schematic designator C4-6)
C4-6_LD3 "0.1uF" 0805 103.9,64.7 r270 top (schematic designator C4-6)
C4-6_LD4 "0.1uF" 0805 148,64.7 r270 top (schematic designator C4-6)
C4-6_LD5 "0.1uF" 0805 192.1,64.7 r270 top (schematic designator C4-6)
C4-6_LD6 "0.1uF" 0805 236.2,64.7 r270 top (schematic designator C4-6)
C4-6_LD7 "0.1uF" 0805 280.3,64.7 r270 top (schematic designator C4-6)
C4-6_LD8 "0.1uF" 0805 324.4,64.7 r270 top (schematic designator C4-6)
C4-7_LD1 "0.1uF" 0805 9.2,48.5 r0 top (schematic designator C4-7)
C4-7_LD2 "0.1uF" 0805 53.3,48.5 r0 top (schematic designator C4-7)
C4-7_LD3 "0.1uF" 0805 97.4,48.5 r0 top (schematic designator C4-7)
C4-7_LD4 "0.1uF" 0805 141.5,48.5 r0 top (schematic designator C4-7)
C4-7_LD5 "0.1uF" 0805 185.6,48.5 r0 top (schematic designator C4-7)
C4-7_LD6 "0.1uF" 0805 229.7,48.5 r0 top (schematic designator C4-7)
C4-7_LD7 "0.1uF" 0805 273.8,48.5 r0 top (schematic designator C4-7)
C4-7_LD8 "0.1uF" 0805 317.9,48.5 r0 top (schematic designator C4-7)
C4-8_LD1 "0.1uF" 0805 8.1,63.9 r0 top (schematic designator C4-8)
C4-8_LD2 "0.1uF" 0805 52.2,63.9 r0 top (schematic designator C4-8)
C4-8_LD3 "0.1uF" 0805 96.3,63.9 r0 top (schematic designator C4-8)
C4-8_LD4 "0.1uF" 0805 140.4,63.9 r0 top (schematic designator C4-8)
C4-8_LD5 "0.1uF" 0805 184.5,63.9 r0 top (schematic designator C4-8)
C4-8_LD6 "0.1uF" 0805 228.6,63.9 r0 top (schematic designator C4-8)
C4-8_LD7 "0.1uF" 0805 272.7,63.9 r0 top (schematic designator C4-8)
C4-8_LD8 "0.1uF" 0805 316.8,63.9 r0 top (schematic designator C4-8)
C5-1 "500pF NP0" 0805 169.1,126.1 r90 top
C5-1_LD1 "1uF" 0805 3.9,61.2 r270 top (schematic designator C5-1)
C5-1_LD2 "1uF" 0805 48,61.2 r270 top (schematic designator C5-1)
C5-1_LD3 "1uF" 0805 92.1,61.2 r270 top (schematic designator C5-1)
C5-1_LD4 "1uF" 0805 136.2,61.2 r270 top (schematic designator C5-1)
C5-1_LD5 "1uF" 0805 180.3,61.2 r270 top (schematic designator C5-1)
C5-1_LD6 "1uF" 0805 224.4,61.2 r270 top (schematic designator C5-1)
C5-1_LD7 "1uF" 0805 268.5,61.2 r270 top (schematic designator C5-1)
C5-1_LD8 "1uF" 0805 312.6,61.2 r270 top (schematic designator C5-1)
C6-1 "10pF?" 0805 176.8,167 r90 top
CE-1 "560uF" CapElec 260.7,176.05 r90 top
CE-2 "560uF" CapElec 229.2,133.9 r0 top
CE-3 "1mF" CapElec 278.1,176.05 r90 top
CE-4 "560uF" CapElec 294.7,139.6 r180 top
CE-5 "1mF" CapElec 364,176.05 r90 top
CE-6 "560uF" CapElec 346.4,176.05 r90 top
CE-7 "220uF" ElectrolyticCapacitor 335.9,122.8 r180 top
DAC_1 "AD5669" 16-TSSOP 168.4,146.55 r0 top
DL-1_LD1 "DLatch" "6-TSSOP / SC-70-6" 4.55,51.6 r270 top (schematic designator DL-1)
DL-1_LD2 "DLatch" "6-TSSOP / SC-70-6" 48.65,51.6 r270 top (schematic designator DL-1)
DL-1_LD3 "DLatch" "6-TSSOP / SC-70-6" 92.75,51.6 r270 top (schematic designator DL-1)
DL-1_LD4 "DLatch" "6-TSSOP / SC-70-6" 136.85,51.6 r270 top (schematic designator DL-1)
DL-1_LD5 "DLatch" "6-TSSOP / SC-70-6" 180.95,51.6 r270 top (schematic designator DL-1)
DL-1_LD6 "DLatch" "6-TSSOP / SC-70-6" 225.05,51.6 r270 top (schematic designator DL-1)
DL-1_LD7 "DLatch" "6-TSSOP / SC-70-6" 269.15,51.6 r270 top (schematic designator DL-1)
DL-1_LD8 "DLatch" "6-TSSOP / SC-70-6" 313.25,51.6 r270 top (schematic designator DL-1)
F1 "FerriteBead1" FerriteBead1 314.6,121.6 r270 top
Fan1 "FanIO1" Fan1 26.6,95.6 r0 top locked
Fan2 "FanIO1" Fan1 114.8,95.6 r0 top locked
Fan3 "FanIO1" Fan1 203,95.6 r0 top locked
Fan4 "FanIO1" Fan1 291.2,95.6 r0 top locked
Fan5 "FanIO1" Fan1 89.6,113.9 r90 top
H1 "Header_RA_2x10" "HeaderRA 2x10" 157.16,180.5 r0 top
H2 "HeaderPower_Molx" "Header Molex Mini-Fit Jr 5569 - duplicate" 369.2,11 r0 top
I1 "1uH" Inductor_HighC 275.725,161.5 r180 top
I2 "1uH" Inductor_HighC 360.95,161.5 r180 top
I3 "15uH" Inductor1 346.958,113.868 r90 top
Iso-1 "Isolator_I2C" "16-SOIC Wide" 187.58,166 r270 top
Iso-2 "Isolator_General" "16-SOIC Wide" 153.31,166 r270 top
Iso-3 "Isolator_General" "16-SOIC Wide" 140.58,166 r270 top
J1-1_LD1 "Jumper3B" Jumper3B 7.9,54.1 r0 top (schematic designator J1-1)
J1-1_LD2 "Jumper3B" Jumper3B 52,54.1 r0 top (schematic designator J1-1)
J1-1_LD3 "Jumper3B" Jumper3B 96.1,54.1 r0 top (schematic designator J1-1)
J1-1_LD4 "Jumper3B" Jumper3B 140.2,54.1 r0 top (schematic designator J1-1)
J1-1_LD5 "Jumper3B" Jumper3B 184.3,54.1 r0 top (schematic designator J1-1)
J1-1_LD6 "Jumper3B" Jumper3B 228.4,54.1 r0 top (schematic designator J1-1)
J1-1_LD7 "Jumper3B" Jumper3B 272.5,54.1 r0 top (schematic designator J1-1)
J1-1_LD8 "Jumper3B" Jumper3B 316.6,54.1 r0 top (schematic designator J1-1)
J1-3A "Jumper2_HighC" JumperHighC2 222.09,2.9 r270 top
J1-3B "Jumper2_HighC" JumperHighC2 270.3,2.9 r90 top
J1-4 "Jumper3" Jumper 180.16,145.5 r0 top
J1-5 "Jumper3" Jumper 294.5,150.36 r90 top
J1-HB "Jumper3B" Jumper3B 130.6,145.4 r270 top
J_FAN "Jumper2_Pins" Jumper2_Pins 280.3,132.3 r270 top
JG "Jumper_Ground" GndConnector 356,19.9 r90 bottom
LED1-1 "LEDindicator" LEDindicator 324.9,95 r180 top
LED1-2 "LEDindicator" LEDIndicator 358.4,12.1 r90 top
LED1-3 "LEDindicator" LEDindicator 294.6,158.8 r0 top
LED1-4 "LEDindicator" LEDindicator 211,158.5 r0 top
LED1-5 "LEDindicator" LEDindicator 310.9,95.3 r180 top
LED1-6 "LEDindicator" LEDindicator 303.8,115.6 r270 top
LED1_LD1 "Header_Molex_Megafit" "Header Mini-Fit Jr 172648" 18.5,6.1 r0 top (schematic designator LED1)
LED1_LD2 "Header_Molex_Megafit" "Header Mini-Fit Jr 172648" 62.6,6.1 r0 top (schematic designator LED1)
LED1_LD3 "Header_Molex_Megafit" "Header Mini-Fit Jr 172648" 106.7,6.1 r0 top (schematic designator LED1)
LED1_LD4 "Header_Molex_Megafit" "Header Mini-Fit Jr 172648" 150.8,6.1 r0 top (schematic designator LED1)
LED1_LD5 "Header_Molex_Megafit" "Header Mini-Fit Jr 172648" 194.9,6.1 r0 top (schematic designator LED1)
LED1_LD6 "Header_Molex_Megafit" "Header Mini-Fit Jr 172648" 239,6.1 r0 top (schematic designator LED1)
LED1_LD7 "Header_Molex_Megafit" "Header Mini-Fit Jr 172648" 283.1,6.1 r0 top (schematic designator LED1)
LED1_LD8 "Header_Molex_Megafit" "Header Mini-Fit Jr 172648" 327.2,6.1 r0 top (schematic designator LED1)
LED7 "LEDindicator" LEDindicator 129.3,150.2 r90 top
LED-8 "LEDindicator" LEDindicator 160.4,168.9 r0 top
LEDC_1_LD1 "LEDindicator" LEDIndicator 14.5,56 r270 top (schematic designator LEDC_1)
LEDC_1_LD2 "LEDindicator" LEDIndicator 58.6,56 r270 top (schematic designator LEDC_1)
LEDC_1_LD3 "LEDindicator" LEDIndicator 102.7,56 r270 top (schematic designator LEDC_1)
LEDC_1_LD4 "LEDindicator" LEDIndicator 146.8,56 r270 top (schematic designator LEDC_1)
LEDC_1_LD5 "LEDindicator" LEDIndicator 190.9,56 r270 top (schematic designator LEDC_1)
LEDC_1_LD6 "LEDindicator" LEDIndicator 235,56 r270 top (schematic designator LEDC_1)
LEDC_1_LD7 "LEDindicator" LEDIndicator 279.1,56 r270 top (schematic designator LEDC_1)
LEDC_1_LD8 "LEDindicator" LEDIndicator 323.2,56 r270 top (schematic designator LEDC_1)
M1_LD1 "MOSFET-N-POWER" MOSFET_w_Heatsink 24,27.85 r180 top (schematic designator M1)
M1_LD2 "MOSFET-N-POWER" MOSFET_w_Heatsink 68.1,27.85 r180 top (schematic designator M1)
M1_LD3 "MOSFET-N-POWER" MOSFET_w_Heatsink 112.2,27.85 r180 top (schematic designator M1)
M1_LD4 "MOSFET-N-POWER" MOSFET_w_Heatsink 156.3,27.85 r180 top (schematic designator M1)
M1_LD5 "MOSFET-N-POWER" MOSFET_w_Heatsink 200.4,27.85 r180 top (schematic designator M1)
M1_LD6 "MOSFET-N-POWER" MOSFET_w_Heatsink 244.5,27.85 r180 top (schematic designator M1)
M1_LD7 "MOSFET-N-POWER" MOSFET_w_Heatsink 288.6,27.85 r180 top (schematic designator M1)
M1_LD8 "MOSFET-N-POWER" MOSFET_w_Heatsink 332.7,27.85 r180 top (schematic designator M1)
N1 "NOT" SOT23-5 133.8,151.4 r270 top
Opa1_LD1 "Amplifier_HighCap" SOT23-5 22.8,38.65 r180 top (schematic designator Opa1)
Opa1_LD2 "Amplifier_HighCap" SOT23-5 66.9,38.65 r180 top (schematic designator Opa1)
Opa1_LD3 "Amplifier_HighCap" SOT23-5 111,38.65 r180 top (schematic designator Opa1)
Opa1_LD4 "Amplifier_HighCap" SOT23-5 155.1,38.65 r180 top (schematic designator Opa1)
Opa1_LD5 "Amplifier_HighCap" SOT23-5 199.2,38.65 r180 top (schematic designator Opa1)
Opa1_LD6 "Amplifier_HighCap" SOT23-5 243.3,38.65 r180 top (schematic designator Opa1)
Opa1_LD7 "Amplifier_HighCap" SOT23-5 287.4,38.65 r180 top (schematic designator Opa1)
Opa1_LD8 "Amplifier_HighCap" SOT23-5 331.5,38.65 r180 top (schematic designator Opa1)
Opa2_LD1 "Amplifier_Precision2" SOT23-5 20.05,47.1 r90 top (schematic designator Opa2)
Opa2_LD2 "Amplifier_Precision2" SOT23-5 64.15,47.1 r90 top (schematic designator Opa2)
Opa2_LD3 "Amplifier_Precision2" SOT23-5 108.25,47.1 r90 top (schematic designator Opa2)
Opa2_LD4 "Amplifier_Precision2" SOT23-5 152.35,47.1 r90 top (schematic designator Opa2)
Opa2_LD5 "Amplifier_Precision2" SOT23-5 196.45,47.1 r90 top (schematic designator Opa2)
Opa2_LD6 "Amplifier_Precision2" SOT23-5 240.55,47.1 r90 top (schematic designator Opa2)
Opa2_LD7 "Amplifier_Precision2" SOT23-5 284.65,47.1 r90 top (schematic designator Opa2)
Opa2_LD8 "Amplifier_Precision2" SOT23-5 328.75,47.1 r90 top (schematic designator Opa2)
Opa3_LD1 "Amplifier_Current" 8-TSSOP 14.8,28.073 r270 top (schematic designator Opa3)
Opa3_LD2 "Amplifier_Current" 8-TSSOP 58.9,28.073 r270 top (schematic designator Opa3)
Opa3_LD3 "Amplifier_Current" 8-TSSOP 103,28.073 r270 top (schematic designator Opa3)
Opa3_LD4 "Amplifier_Current" 8-TSSOP 147.1,28.073 r270 top (schematic designator Opa3)
Opa3_LD5 "Amplifier_Current" 8-TSSOP 191.2,28.073 r270 top (schematic designator Opa3)
Opa3_LD6 "Amplifier_Current" 8-TSSOP 235.3,28.073 r270 top (schematic designator Opa3)
Opa3_LD7 "Amplifier_Current" 8-TSSOP 279.4,28.073 r270 top (schematic designator Opa3)
Opa3_LD8 "Amplifier_Current" 8-TSSOP 323.5,28.073 r270 top (schematic designator Opa3)
Opa4_LD1 "Amplifier_Speed" SOT23-5 5.9,45.15 r0 top (schematic designator Opa4)
Opa4_LD2 "Amplifier_Speed" SOT23-5 50,45.15 r0 top (schematic designator Opa4)
Opa4_LD3 "Amplifier_Speed" SOT23-5 94.1,45.15 r0 top (schematic designator Opa4)
Opa4_LD4 "Amplifier_Speed" SOT23-5 138.2,45.15 r0 top (schematic designator Opa4)
Opa4_LD5 "Amplifier_Speed" SOT23-5 182.3,45.15 r0 top (schematic designator Opa4)
Opa4_LD6 "Amplifier_Speed" SOT23-5 226.4,45.15 r0 top (schematic designator Opa4)
Opa4_LD7 "Amplifier_Speed" SOT23-5 270.5,45.15 r0 top (schematic designator Opa4)
Opa4_LD8 "Amplifier_Speed" SOT23-5 314.6,45.15 r0 top (schematic designator Opa4)
Opa5_LD1 "Amplifier_Instrumentation" 8-SOIC-NoHeatPad 3.59,30 r90 top (schematic designator Opa5)
Opa5_LD2 "Amplifier_Instrumentation" 8-SOIC-NoHeatPad 47.69,30 r90 top (schematic designator Opa5)
Opa5_LD3 "Amplifier_Instrumentation" 8-SOIC-NoHeatPad 91.79,30 r90 top (schematic designator Opa5)
Opa5_LD4 "Amplifier_Instrumentation" 8-SOIC-NoHeatPad 135.89,30 r90 top (schematic designator Opa5)
Opa5_LD5 "Amplifier_Instrumentation" 8-SOIC-NoHeatPad 179.99,30 r90 top (schematic designator Opa5)
Opa5_LD6 "Amplifier_Instrumentation" 8-SOIC-NoHeatPad 224.09,30 r90 top (schematic designator Opa5)
Opa5_LD7 "Amplifier_Instrumentation" 8-SOIC-NoHeatPad 268.19,30 r90 top (schematic designator Opa5)
Opa5_LD8 "Amplifier_Instrumentation" 8-SOIC-NoHeatPad 312.29,30 r90 top (schematic designator Opa5)
Opa_1 "Amplifier_Precision2" SOT23-5 171.4,124.75 r90 top
OpAmp-1 "Amplifier_Isolator" 16-QSOP 170.56,158.329 r90 top
OpAmp-2 "Amplifier_Precision2" SOT23-5 175.25,153.7 r270 top
Photo1_LD1 "Connector_M5" Connector_M5 5.55,17.15 r0 top (schematic designator Photo1)
Photo1_LD2 "Connector_M5" Connector_M5 49.65,17.15 r0 top (schematic designator Photo1)
Photo1_LD3 "Connector_M5" Connector_M5 93.75,17.15 r0 top (schematic designator Photo1)
Photo1_LD4 "Connector_M5" Connector_M5 137.85,17.15 r0 top (schematic designator Photo1)
Photo1_LD5 "Connector_M5" Connector_M5 181.95,17.15 r0 top (schematic designator Photo1)
Photo1_LD6 "Connector_M5" Connector_M5 226.05,17.15 r0 top (schematic designator Photo1)
Photo1_LD7 "Connector_M5" Connector_M5 270.15,17.15 r0 top (schematic designator Photo1)
Photo1_LD8 "Connector_M5" Connector_M5 314.25,17.15 r0 top (schematic designator Photo1)
PWM1 "PWM28" 28-TSSOP 151.7,151.05 r0 top
R0-1 "NC" 0805 183.6,171.5 r180 top
R0-2 "NC" 0805 181.5,169.6 r180 top
R1-1 "3k3" 0805 183.8,149.9 r180 top
R1-1_LD1 "10" 0805 23.5,34.7 r90 top (schematic designator R1-1)
R1-1_LD2 "10" 0805 67.6,34.7 r90 top (schematic designator R1-1)
R1-1_LD3 "10" 0805 111.7,34.7 r90 top (schematic designator R1-1)
R1-1_LD4 "10" 0805 155.8,34.7 r90 top (schematic designator R1-1)
R1-1_LD5 "10" 0805 199.9,34.7 r90 top (schematic designator R1-1)
R1-1_LD6 "10" 0805 244,34.7 r90 top (schematic designator R1-1)
R1-1_LD7 "10" 0805 288.1,34.7 r90 top (schematic designator R1-1)
R1-1_LD8 "10" 0805 332.2,34.7 r90 top (schematic designator R1-1)
R1-2 "3k3" 0805 182,151.7 r180 top
R1-2 "0" 0805 327,48.6 r270 top
R1-2_LD5 "0" 0805 194.7,48.6 r270 top (schematic designator R1-2)
R1-3_LD5 "4.7k" 0805 185.6,39.3 r90 top (schematic designator R1-3)
R1-3_LD8 "0" 0805 317.9,39.3 r90 top (schematic designator R1-3)
R1-4 "0" 0805 331.3,60.6 r180 top
R1-5_LD1 "10k?" 0805 20.5,62.6 r90 top (schematic designator R1-5)
R1-5_LD2 "10k?" 0805 64.6,62.6 r90 top (schematic designator R1-5)
R1-5_LD3 "10k?" 0805 108.7,62.6 r90 top (schematic designator R1-5)
R1-5_LD4 "10k?" 0805 152.8,62.6 r90 top (schematic designator R1-5)
R1-5_LD5 "10k?" 0805 196.9,62.6 r90 top (schematic designator R1-5)
R1-5_LD6 "10k?" 0805 241,62.6 r90 top (schematic designator R1-5)
R1-5_LD7 "10k?" 0805 285.1,62.6 r90 top (schematic designator R1-5)
R1-5_LD8 "10k?" 0805 329.2,62.6 r90 top (schematic designator R1-5)
R1-6_LD5 "0" 0805 180.8,22.1 r90 top (schematic designator R1-6)
R1-7_LD5 "0" 0805 183.3,22.1 r90 top (schematic designator R1-7)
R2-1 "500" 0603 327.3,95.2 r90 top
R2-1_LD1 "100,200" 0805 21.1,36.8 r270 top (schematic designator R2-1)
R2-1_LD2 "100,200" 0805 65.2,36.8 r270 top (schematic designator R2-1)
R2-1_LD3 "100,200" 0805 109.3,36.8 r270 top (schematic designator R2-1)
R2-1_LD4 "100,200" 0805 153.4,36.8 r270 top (schematic designator R2-1)
R2-1_LD5 "100,200" 0805 197.5,36.8 r270 top (schematic designator R2-1)
R2-1_LD6 "100,200" 0805 241.6,36.8 r270 top (schematic designator R2-1)
R2-1_LD7 "100,200" 0805 285.7,36.8 r270 top (schematic designator R2-1)
R2-1_LD8 "100,200" 0805 329.8,36.8 r270 top (schematic designator R2-1)
R2-2 "500" 0603 295,160.8 r0 top
R2-3 "500" 0603 211.2,160.4 r0 top
R2-4 "2k" 0603 358.3,10.7 r270 top
R2-5 "500" 0603 313.6,95.1 r90 top
R2-6 "500" 0603 303.8,117.6 r90 top
R2-7 "500" 0603 129.3,147.9 r270 top
R2-8 "500" 0603 160.4,166.4 r0 top
R3-1 "10kP" 0805 174.4,168.4 r180 top
R3-1_LD1 "2.4k" 0805 16.6,40.8 r270 top (schematic designator R3-1)
R3-1_LD2 "2.4k" 0805 60.7,40.8 r270 top (schematic designator R3-1)
R3-1_LD3 "2.4k" 0805 104.8,40.8 r270 top (schematic designator R3-1)
R3-1_LD4 "2.4k" 0805 148.9,40.8 r270 top (schematic designator R3-1)
R3-1_LD5 "2.4k" 0805 193,40.8 r270 top (schematic designator R3-1)
R3-1_LD6 "2.4k" 0805 237.1,40.8 r270 top (schematic designator R3-1)
R3-1_LD7 "2.4k" 0805 281.2,40.8 r270 top (schematic designator R3-1)
R3-1_LD8 "2.4k" 0805 325.3,40.8 r270 top (schematic designator R3-1)
R3-2 "10kP" 0805 174.4,166.4 r180 top
R3-2_LD1 "2.4k" 0805 16.9,42.4 r180 top (schematic designator R3-2)
R3-2_LD2 "2.4k" 0805 61,42.4 r180 top (schematic designator R3-2)
R3-2_LD3 "2.4k" 0805 105.1,42.4 r180 top (schematic designator R3-2)
R3-2_LD4 "2.4k" 0805 149.2,42.4 r180 top (schematic designator R3-2)
R3-2_LD5 "2.4k" 0805 193.3,42.4 r180 top (schematic designator R3-2)
R3-2_LD6 "2.4k" 0805 237.4,42.4 r180 top (schematic designator R3-2)
R3-2_LD7 "2.4k" 0805 281.5,42.4 r180 top (schematic designator R3-2)
R3-2_LD8 "2.4k" 0805 325.6,42.4 r180 top (schematic designator R3-2)
R3-3 "10kP" 0805 171.6,150.6 r270 top
R3-3_LD1 "2.4k" 0805 20.1,58.2 r0 top (schematic designator R3-3)
R3-3_LD2 "2.4k" 0805 64.2,58.2 r0 top (schematic designator R3-3)
R3-3_LD3 "2.4k" 0805 108.3,58.2 r0 top (schematic designator R3-3)
R3-3_LD4 "2.4k" 0805 152.4,58.2 r0 top (schematic designator R3-3)
R3-3_LD5 "2.4k" 0805 196.5,58.2 r0 top (schematic designator R3-3)
R3-3_LD6 "2.4k" 0805 240.6,58.2 r0 top (schematic designator R3-3)
R3-3_LD7 "2.4k" 0805 284.7,58.2 r0 top (schematic designator R3-3)
R3-3_LD8 "2.4k" 0805 328.8,58.2 r0 top (schematic designator R3-3)
R3-4 "10kP" 0805 171.6,152.4 r90 top
R3-4_LD1 "2.4k" 0805 24.2,58.8 r270 top (schematic designator R3-4)
R3-4_LD2 "2.4k" 0805 68.3,58.8 r270 top (schematic designator R3-4)
R3-4_LD3 "2.4k" 0805 112.4,58.8 r270 top (schematic designator R3-4)
R3-4_LD4 "2.4k" 0805 156.5,58.8 r270 top (schematic designator R3-4)
R3-4_LD5 "2.4k" 0805 200.6,58.8 r270 top (schematic designator R3-4)
R3-4_LD5 "0" 0805 199,60.6 r180 top (schematic designator R1-4)
R3-4_LD6 "2.4k" 0805 244.7,58.8 r270 top (schematic designator R3-4)
R3-4_LD7 "2.4k" 0805 288.8,58.8 r270 top (schematic designator R3-4)
R3-4_LD8 "2.4k" 0805 332.9,58.8 r270 top (schematic designator R3-4)
R4-1_LD1 "500" 0805 22.3,55.4 r180 top (schematic designator R4-1)
R4-1_LD2 "500" 0805 66.4,55.4 r180 top (schematic designator R4-1)
R4-1_LD3 "500" 0805 110.5,55.4 r180 top (schematic designator R4-1)
R4-1_LD4 "500" 0805 154.6,55.4 r180 top (schematic designator R4-1)
R4-1_LD5 "500" 0805 198.7,55.4 r180 top (schematic designator R4-1)
R4-1_LD6 "500" 0805 242.8,55.4 r180 top (schematic designator R4-1)
R4-1_LD7 "500" 0805 286.9,55.4 r180 top (schematic designator R4-1)
R4-1_LD8 "500" 0805 331,55.4 r180 top (schematic designator R4-1)
R4-2 "NC" 0805 193.2,151 r90 top
R5-1 "10k" 0805 168.4,150.1 r270 top
R5-1_LD1 "3m" 2512 18.1,22.4 r90 top (schematic designator R5-1)
R5-1_LD2 "3m" 2512 62.2,22.4 r90 top (schematic designator R5-1)
R5-1_LD3 "3m" 2512 106.3,22.4 r90 top (schematic designator R5-1)
R5-1_LD4 "3m" 2512 150.4,22.4 r90 top (schematic designator R5-1)
R5-1_LD5 "3m" 2512 194.5,22.4 r90 top (schematic designator R5-1)
R5-1_LD6 "3m" 2512 238.6,22.4 r90 top (schematic designator R5-1)
R5-1_LD7 "3m" 2512 282.7,22.4 r90 top (schematic designator R5-1)
R5-1_LD8 "3m" 2512 326.8,22.4 r90 top (schematic designator R5-1)
R5-2 "10k" 0805 174.2,140.5 r270 top
R6-1 "681" 1206 306.4,116.1 r270 top
R6-1_LD1 "12k" 0805 8.4,46.7 r0 top (schematic designator R6-1)
R6-1_LD2 "12k" 0805 52.5,46.7 r0 top (schematic designator R6-1)
R6-1_LD3 "12k" 0805 96.6,46.7 r0 top (schematic designator R6-1)
R6-1_LD4 "12k" 0805 140.7,46.7 r0 top (schematic designator R6-1)
R6-1_LD5 "12k" 0805 184.8,46.7 r0 top (schematic designator R6-1)
R6-1_LD6 "12k" 0805 228.9,46.7 r0 top (schematic designator R6-1)
R6-1_LD7 "12k" 0805 273,46.7 r0 top (schematic designator R6-1)
R6-1_LD8 "12k" 0805 317.1,46.7 r0 top (schematic designator R6-1)
R7-1 "500" 1206 175.5,123.8 r270 top
R7-1_LD1 "10k" 0805 4.8,46.7 r0 top (schematic designator R7-1)
R7-1_LD2 "10k" 0805 48.9,46.7 r0 top (schematic designator R7-1)
R7-1_LD3 "10k" 0805 93,46.7 r0 top (schematic designator R7-1)
R7-1_LD4 "10k" 0805 137.1,46.7 r0 top (schematic designator R7-1)
R7-1_LD5 "10k" 0805 181.2,46.7 r0 top (schematic designator R7-1)
R7-1_LD6 "10k" 0805 225.3,46.7 r0 top (schematic designator R7-1)
R7-1_LD7 "10k" 0805 269.4,46.7 r0 top (schematic designator R7-1)
R7-1_LD8 "10k" 0805 313.5,46.7 r0 top (schematic designator R7-1)
R7-2_LD1 "10k" 0805 7.8,49.3 r180 top (schematic designator R7-2)
R7-2_LD2 "10k" 0805 51.9,49.3 r180 top (schematic designator R7-2)
R7-2_LD3 "10k" 0805 96,49.3 r180 top (schematic designator R7-2)
R7-2_LD4 "10k" 0805 140.1,49.3 r180 top (schematic designator R7-2)
R7-2_LD5 "10k" 0805 184.2,49.3 r180 top (schematic designator R7-2)
R7-2_LD6 "10k" 0805 228.3,49.3 r180 top (schematic designator R7-2)
R7-2_LD7 "10k" 0805 272.4,49.3 r180 top (schematic designator R7-2)
R7-2_LD8 "10k" 0805 316.5,49.3 r180 top (schematic designator R7-2)
R7-3_LD1 "10k" 0805 14.3,45.2 r0 top (schematic designator R7-3)
R7-3_LD2 "10k" 0805 58.4,45.2 r0 top (schematic designator R7-3)
R7-3_LD3 "10k" 0805 102.5,45.2 r0 top (schematic designator R7-3)
R7-3_LD4 "10k" 0805 146.6,45.2 r0 top (schematic designator R7-3)
R7-3_LD5 "10k" 0805 190.7,45.2 r0 top (schematic designator R7-3)
R7-3_LD6 "10k" 0805 234.8,45.2 r0 top (schematic designator R7-3)
R7-3_LD7 "10k" 0805 278.9,45.2 r0 top (schematic designator R7-3)
R7-3_LD8 "10k" 0805 323,45.2 r0 top (schematic designator R7-3)
R7-4_LD1 "10k" 0805 8.1,66 r0 top (schematic designator R7-4)
R7-4_LD2 "10k" 0805 52.2,66 r0 top (schematic designator R7-4)
R7-4_LD3 "10k" 0805 96.3,66 r0 top (schematic designator R7-4)
R7-4_LD4 "10k" 0805 140.4,66 r0 top (schematic designator R7-4)
R7-4_LD5 "10k" 0805 184.5,66 r0 top (schematic designator R7-4)
R7-4_LD6 "10k" 0805 228.6,66 r0 top (schematic designator R7-4)
R7-4_LD7 "10k" 0805 272.7,66 r0 top (schematic designator R7-4)
R7-4_LD8 "10k" 0805 316.8,66 r0 top (schematic designator R7-4)
R7-5_LD1 "10k" 0805 7.4,58.6 r90 top (schematic designator R7-5)
R7-5_LD2 "10k" 0805 51.5,58.6 r90 top (schematic designator R7-5)
R7-5_LD3 "10k" 0805 95.6,58.6 r90 top (schematic designator R7-5)
R7-5_LD4 "10k" 0805 139.7,58.6 r90 top (schematic designator R7-5)
R7-5_LD5 "10k" 0805 183.8,58.6 r90 top (schematic designator R7-5)
R7-5_LD6 "10k" 0805 227.9,58.6 r90 top (schematic designator R7-5)
R7-5_LD7 "10k" 0805 272,58.6 r90 top (schematic designator R7-5)
R7-5_LD8 "10k" 0805 316.1,58.6 r90 top (schematic designator R7-5)
R7-6_LD1 "10k" 0805 8.1,68.1 r0 top (schematic designator R7-6)
R7-6_LD2 "10k" 0805 52.2,68.1 r0 top (schematic designator R7-6)
R7-6_LD3 "10k" 0805 96.3,68.1 r0 top (schematic designator R7-6)
R7-6_LD4 "10k" 0805 140.4,68.1 r0 top (schematic designator R7-6)
R7-6_LD5 "10k" 0805 184.5,68.1 r0 top (schematic designator R7-6)
R7-6_LD6 "10k" 0805 228.6,68.1 r0 top (schematic designator R7-6)
R7-6_LD7 "10k" 0805 272.7,68.1 r0 top (schematic designator R7-6)
R7-6_LD8 "10k" 0805 316.8,68.1 r0 top (schematic designator R7-6)
R8-1 "5k" 1206 175.5,128.5 r270 top
R8-1_LD1 "2.7M" 0805 26.3,60.6 r180 top (schematic designator R8-1)
R8-1_LD2 "2.7M" 0805 70.4,60.6 r180 top (schematic designator R8-1)
R8-1_LD3 "2.7M" 0805 114.5,60.6 r180 top (schematic designator R8-1)
R8-1_LD4 "2.7M" 0805 158.6,60.6 r180 top (schematic designator R8-1)
R8-1_LD5 "2.7M" 0805 202.7,60.6 r180 top (schematic designator R8-1)
R8-1_LD6 "2.7M" 0805 246.8,60.6 r180 top (schematic designator R8-1)
R8-1_LD7 "2.7M" 0805 290.9,60.6 r180 top (schematic designator R8-1)
R8-1_LD8 "2.7M" 0805 335,60.6 r180 top (schematic designator R8-1)
R9-1 "NC, 5.1" 1206 171.3,122.6 r270 top
R9-1_LD1 "NC" 0805 10.1,25.9 r180 top (schematic designator R9-1)
R9-1_LD2 "NC" 0805 54.2,25.9 r180 top (schematic designator R9-1)
R9-1_LD3 "NC" 0805 98.3,25.9 r180 top (schematic designator R9-1)
R9-1_LD4 "NC" 0805 142.4,25.9 r180 top (schematic designator R9-1)
R9-1_LD5 "NC" 0805 186.5,25.9 r180 top (schematic designator R9-1)
R9-1_LD6 "NC" 0805 230.6,25.9 r180 top (schematic designator R9-1)
R9-1_LD7 "NC" 0805 274.7,25.9 r180 top (schematic designator R9-1)
R9-1_LD8 "NC" 0805 318.8,25.9 r180 top (schematic designator R9-1)
R9-2_LD1 "NC" 0805 2.1,25.6 r90 top (schematic designator R9-2)
R9-2_LD2 "NC" 0805 46.3,25.8 r90 top (schematic designator R9-2)
R9-2_LD3 "NC" 0805 90.7,25.6 r90 top (schematic designator R9-2)
R9-2_LD4 "NC" 0805 134.7,25.8 r90 top (schematic designator R9-2)
R9-2_LD5 "NC" 0805 178.8,25.8 r90 top (schematic designator R9-2)
R9-2_LD6 "NC" 0805 222.7,25.9 r90 top (schematic designator R9-2)
R9-2_LD7 "NC" 0805 266.7,25.8 r90 top (schematic designator R9-2)
R9-2_LD8 "NC" 0805 310.9,25.9 r90 top (schematic designator R9-2)
R10-1 "100,200" 0805 169.1,124.7 r270 top
R10-1_LD1 "49.9k" 0805 4.4,27.9 r0 top (schematic designator R10-1)
R10-1_LD2 "49.9k" 0805 48.5,27.9 r0 top (schematic designator R10-1)
R10-1_LD3 "49.9k" 0805 92.6,27.9 r0 top (schematic designator R10-1)
R10-1_LD4 "49.9k" 0805 136.7,27.9 r0 top (schematic designator R10-1)
R10-1_LD5 "49.9k" 0805 180.8,27.9 r0 top (schematic designator R10-1)
R10-1_LD6 "49.9k" 0805 224.9,27.9 r0 top (schematic designator R10-1)
R10-1_LD7 "49.9k" 0805 269,27.9 r0 top (schematic designator R10-1)
R10-1_LD8 "49.9k" 0805 313.1,27.9 r0 top (schematic designator R10-1)
R11-1_LD1 "500k" 0805 7.3,41.7 r270 top (schematic designator R11-1)
R11-1_LD2 "500k" 0805 51.4,41.7 r270 top (schematic designator R11-1)
R11-1_LD3 "500k" 0805 95.5,41.7 r270 top (schematic designator R11-1)
R11-1_LD4 "500k" 0805 139.6,41.7 r270 top (schematic designator R11-1)
R11-1_LD5 "500k" 0805 183.7,41.7 r270 top (schematic designator R11-1)
R11-1_LD6 "500k" 0805 227.8,41.7 r270 top (schematic designator R11-1)
R11-1_LD7 "500k" 0805 271.9,41.7 r270 top (schematic designator R11-1)
R11-1_LD8 "500k" 0805 316,41.7 r270 top (schematic designator R11-1)
R11-2_LD1 "500k" 0805 2.5,38.7 r0 top (schematic designator R11-2)
R11-2_LD2 "500k" 0805 46.6,38.7 r0 top (schematic designator R11-2)
R11-2_LD3 "500k" 0805 90.7,38.7 r0 top (schematic designator R11-2)
R11-2_LD4 "500k" 0805 134.8,38.7 r0 top (schematic designator R11-2)
R11-2_LD5 "500k" 0805 178.9,38.7 r0 top (schematic designator R11-2)
R11-2_LD6 "500k" 0805 223,38.7 r0 top (schematic designator R11-2)
R11-2_LD7 "500k" 0805 267.1,38.7 r0 top (schematic designator R11-2)
R11-2_LD8 "500k" 0805 311.2,38.7 r0 top (schematic designator R11-2)
R12-1_LD1 "NC,100" 0805 6.541,25.89 r180 top (schematic designator R12-1)
R12-1_LD2 "NC,100" 0805 50.641,25.89 r180 top (schematic designator R12-1)
R12-1_LD3 "NC,100" 0805 94.741,25.89 r180 top (schematic designator R12-1)
R12-1_LD4 "NC,100" 0805 138.841,25.89 r180 top (schematic designator R12-1)
R12-1_LD5 "NC,100" 0805 182.941,25.89 r180 top (schematic designator R12-1)
R12-1_LD6 "NC,100" 0805 227.041,25.89 r180 top (schematic designator R12-1)
R12-1_LD7 "NC,100" 0805 271.141,25.89 r180 top (schematic designator R12-1)
R12-1_LD8 "NC,100" 0805 315.241,25.89 r180 top (schematic designator R12-1)
R13-1_LD1 "500" 0603 16.1,55.6 r270 top (schematic designator R13-1)
R13-1_LD2 "500" 0603 60.2,55.6 r270 top (schematic designator R13-1)
R13-1_LD3 "500" 0603 104.3,55.6 r270 top (schematic designator R13-1)
R13-1_LD4 "500" 0603 148.4,55.6 r270 top (schematic designator R13-1)
R13-1_LD5 "500" 0603 192.5,55.6 r270 top (schematic designator R13-1)
R13-1_LD6 "500" 0603 236.6,55.6 r270 top (schematic designator R13-1)
R13-1_LD7 "500" 0603 280.7,55.6 r270 top (schematic designator R13-1)
R13-1_LD8 "500" 0603 324.8,55.6 r270 top (schematic designator R13-1)
R14-1_LD1 "787?" 0805 18,64.7 r270 top (schematic designator R14-1)
R14-1_LD2 "787?" 0805 62.1,64.7 r270 top (schematic designator R14-1)
R14-1_LD3 "787?" 0805 106.2,64.7 r270 top (schematic designator R14-1)
R14-1_LD4 "787?" 0805 150.3,64.7 r270 top (schematic designator R14-1)
R14-1_LD5 "787?" 0805 194.4,64.7 r270 top (schematic designator R14-1)
R14-1_LD6 "787?" 0805 238.5,64.7 r270 top (schematic designator R14-1)
R14-1_LD7 "787?" 0805 282.6,64.7 r270 top (schematic designator R14-1)
R14-1_LD8 "787?" 0805 326.7,64.7 r270 top (schematic designator R14-1)
Ref1 "3V3Reference" 8-SOIC-NoHeatPad 173.6,134.87 r0 top
RLim-1 "680k" 0805 211.5,166 r0 top
RLim-2 "680k" 0805 298.9,163.7 r0 top
RPD_1 "10k" 0603 135.6,169.6 r180 top
RPD_2 "10k" 0603 153.8,168.2 r0 top
RPD_3 "10k" 0603 153.9,169.8 r0 top
RPD_4 "10k" 0603 158.5,169.8 r180 top
RPD_5 "10k" 0603 159.9,170.8 r0 top
RPD_6 "10k" 0603 147.4,174.1 r90 top
RPD_7 "10k" 0603 144.8,174.8 r180 top
RPD_8 "10k" 0603 140.3,176.3 r0 top
RPD_9 "10k" 0603 136.7,177.4 r180 top
RPD_10 "10k" 0603 128.6,154.4 r90 top
RPD_LD1 "10k" 0603 5.4,82.5 r0 top (schematic designator RPD)
RPD_LD2 "10k" 0603 46.1,84.4 r180 top (schematic designator RPD)
RPD_LD3 "10k" 0603 92.1,83.5 r180 top (schematic designator RPD)
RPD_LD4 "10k" 0603 137.7,84 r180 top (schematic designator RPD)
RPD_LD5 "10k" 0603 180.5,84 r180 top (schematic designator RPD)
RPD_LD6 "10k" 0603 235.5,82.5 r180 top (schematic designator RPD)
RPD_LD7 "10k" 0603 259.9,84.2 r0 top (schematic designator RPD)
RPD_LD8 "10k" 0603 314.9,85.4 r270 top (schematic designator RPD)
RTrim1 "6k6" 0805 211.4,162.3 r0 top
RTrim2 "2k3" 0805 298.8,161.1 r0 top
S "0" 0805 171.4,140.5 r270 top (schematic designator R4-3)
S "0" 0805 195.1,153.1 r270 top (schematic designator R4-1)
S "0" 0805 315.6,22.1 r90 top (schematic designator R1-7)
S "0" 0805 271.5,22.1 r90 top (schematic designator R1-7)
S "0" 0805 227.4,22.1 r90 top (schematic designator R1-7)
S "0" 0805 139.2,22.1 r90 top (schematic designator R1-7)
S "0" 0805 95.1,22.1 r90 top (schematic designator R1-7)
S "0" 0805 51,22.1 r90 top (schematic designator R1-7)
S "0" 0805 6.9,22.1 r90 top (schematic designator R1-7)
S "0" 0805 313.1,22.1 r90 top (schematic designator R1-6)
S "0" 0805 269,22.1 r90 top (schematic designator R1-6)
S "0" 0805 224.9,22.1 r90 top (schematic designator R1-6)
S "0" 0805 136.7,22.1 r90 top (schematic designator R1-6)
S "0" 0805 92.6,22.1 r90 top (schematic designator R1-6)
S "0" 0805 48.5,22.1 r90 top (schematic designator R1-6)
S "0" 0805 4.4,22.1 r90 top (schematic designator R1-6)
S "0" 0805 287.2,60.6 r180 top (schematic designator R1-4)
S "0" 0805 243.1,60.6 r180 top (schematic designator R1-4)
S "0" 0805 154.9,60.6 r180 top (schematic designator R1-4)
S "0" 0805 110.8,60.6 r180 top (schematic designator R1-4)
S "0" 0805 66.7,60.6 r180 top (schematic designator R1-4)